# Altium PCB Baseboard-Development.PcbDoc (part 4 of 8)
Units mm, origin at the board's own origin, x right, y up, seen from the top; angles counter-clockwise.
Board outline 120 x 90 mm, 6 copper layers (Top Layer, SIGNAL-1, PWR, SIGNAL-2, GND-2, Bottom Layer), stack 1.705 mm thick; 417 components, 313 nets, 1500 pads, 606 vias.
Unrouted connection lines stored in the file: 357.
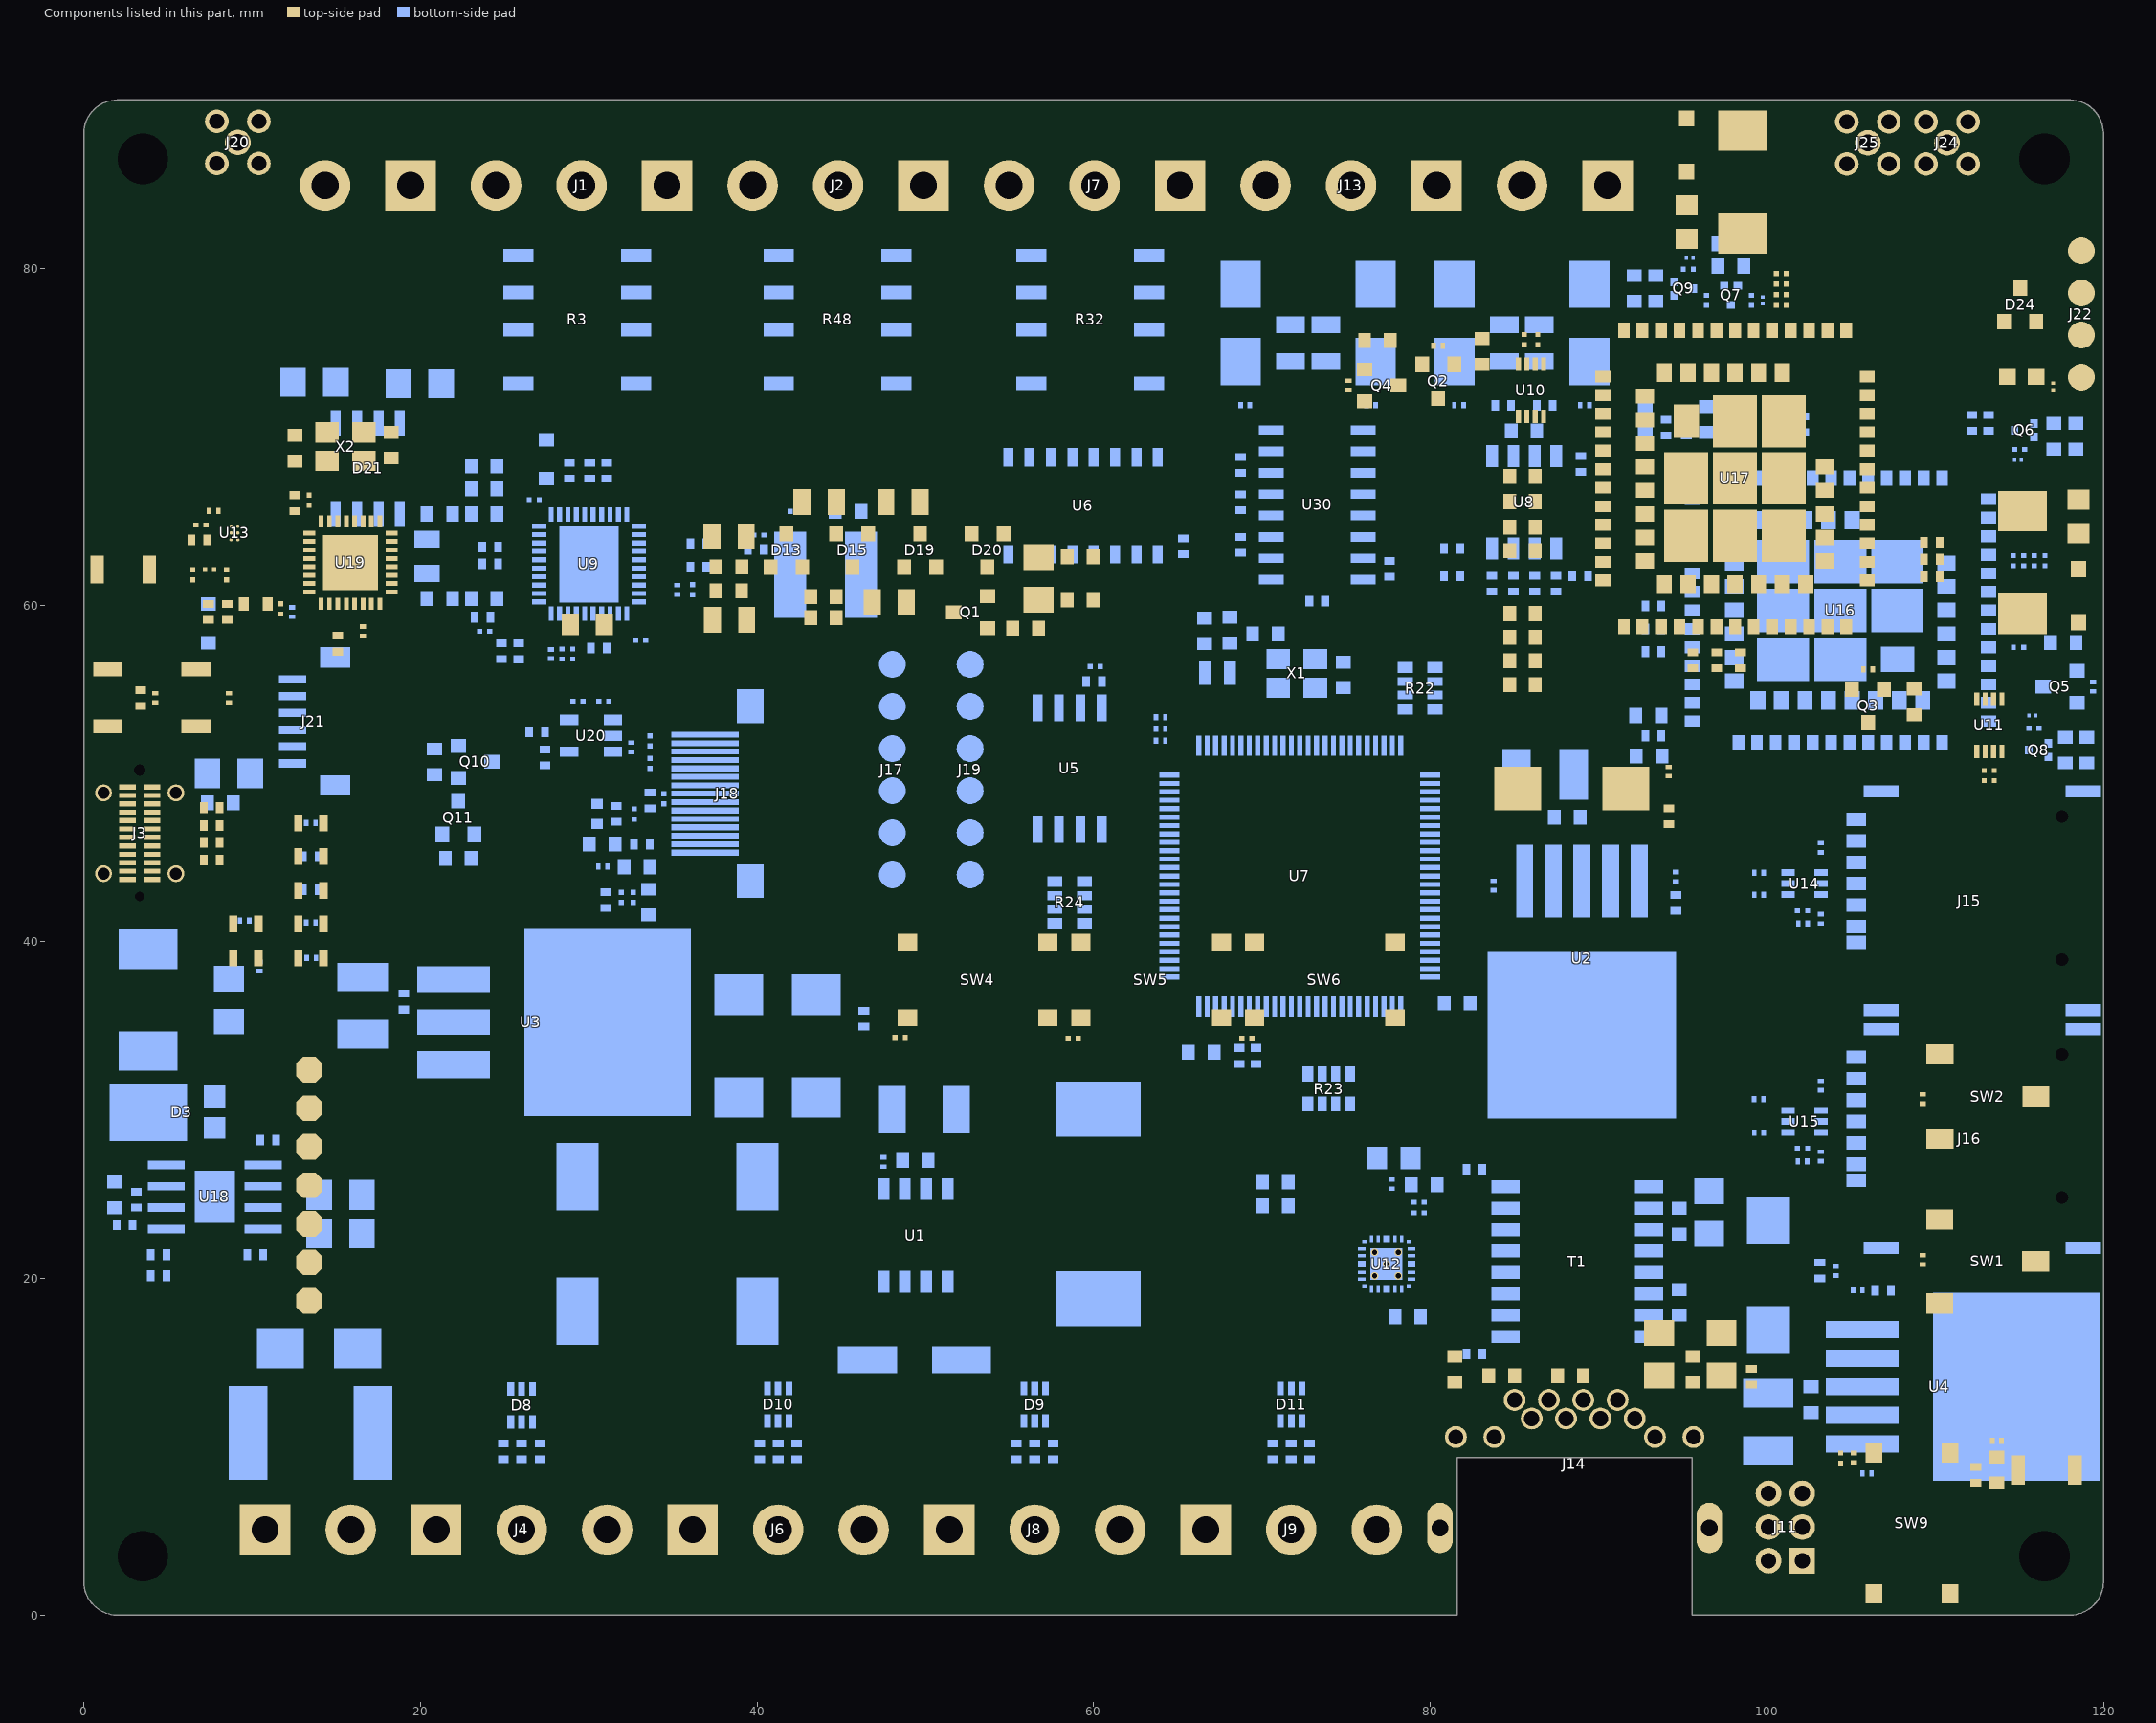
[diagram p6: the components of this part, seen from the top]

## Part data (continued)
R14 R27: library part RC0402FR-0747KL, "RES 47K OHM 1% 1/16W 0402", Case Code (Imperial)=0402, Case Code (Metric)=1005, LCSC Part Number=C93943, Manufacturer=Yageo, Max Operating Temperature=155°C, Max Power Dissipation=63mW, Min Operating Temperature=-55°C, Package Quantity=1, Power Rating=62.5mW, Resistance=47kR, Resistance Tolerance=1%, Resistor Type="Thick Film", Temperature Coefficient=100ppm/°C, Voltage Rating=50V, Case/Package=0402, Category="Chip SMD Resistors", ComponentLink1Description=https://datasheet.ciiva.com/46412/1018594-46412839.pdf?src-supplier=Element14, ComponentLink1URL=https://datasheet.ciiva.com/46412/1018594-46412839.pdf?src-supplier=Element14, ComponentLink2Description=https://datasheet.ciiva.com/2453/pyu-r-int-thick-7-2453389.pdf?src-supplier=Digi-Key, ComponentLink2URL=https://datasheet.ciiva.com/2453/pyu-r-int-thick-7-2453389.pdf?src-supplier=Digi-Key, ComponentLink3Description=https://datasheet.ciiva.com/2453/pyu-r-int-thick-7-2453390.pdf?src-supplier=Digi-Key, ComponentLink3URL=https://datasheet.ciiva.com/2453/pyu-r-int-thick-7-2453390.pdf?src-supplier=Digi-Key, ComponentLink4Description=https://datasheet.ciiva.com/2453/pyu-r-int-thick-7-2453388.pdf?src-supplier=Digi-Key, ComponentLink4URL=https://datasheet.ciiva.com/2453/pyu-r-int-thick-7-2453388.pdf?src-supplier=Digi-Key, ComponentLink5Description=https://datasheet.ciiva.com/15189/getdatasheetpartid-323748-15189466.pdf?src-supplier=Verical, ComponentLink5URL=https://datasheet.ciiva.com/15189/getdatasheetpartid-323748-15189466.pdf?src-supplier=Verical, ComponentLink6Description=https://datasheet.ciiva.com/16793/pyu-rc0402-51-rohs-l-6-r-16793430.pdf?src-supplier=Future+Electronics, ComponentLink6URL=https://datasheet.ciiva.com/16793/pyu-rc0402-51-rohs-l-6-r-16793430.pdf?src-supplier=Future+Electronics, Construction=Rectangular, Depth=0.5mm, Features="Moisture Resistant", Height=0.016inch, Item Type=Resistor, Lead Free="Lead Free", Length=1mm, Manufacturer Part Number=RC0402FR-0747KL, Military Standard=Not, Number of Terminations=2, Packaging="Tape and Reel", Pricing 1="10000=0.00085, 20000=0.00087, 40000=0.00084, 60000=0.00083, 80000=0.00079, 100000=0.00078, 1000000=0.00076 (USD)", RoHS=Yes, RoHS Compliant=Yes, Series=RC, Size Code=0402, Stock 1=680000, Supplier 1=Avnet, Supplier Part Number 1=RC0402FR-0747KL, Termination=SMD/SMT, Tolerance=1%, Width=0.02inch
R15: library part FRC0402F1693TS, "169kΩ 62.5mW Thick Film Resistors 50V ±100ppm/℃ ±1% 0402 Chip Resistor - Surface Mount ROHS", LCSC Part Number=C2974012, Manufacturer=FOJAN, Package=0402, ComponentLink1Description=LCSC, ComponentLink1URL=https://www.lcsc.com/product-detail/Chip-Resistor-Surface-Mount_FOJAN-FRC0402F1693TS_C2974012.html, Item Type=Resistor, Manufacturer Part Number=FRC0402F1693TS
R20 R25 R50 R134 R135 R136 R137 R138 R142 R143: library part RC0402FR-070RL, "RES 0 OHM JUMPER 1/16W 0402", Case Code (Imperial)=0402, Case Code (Metric)=1005, LCSC Part Number=C106231, Manufacturer=Yageo, Max Operating Temperature=155°C, Max Power Dissipation=63mW, Min Operating Temperature=-55°C, Power Rating=62.5mW, Resistance=0R, Resistor Type="Thick Film", Supplier Part Number 1=603-RC0402FR-070RL, Temperature Coefficient=200ppm/°C, Tolerance=1%, Voltage Rating=50V, Case/Package=0402, Category="Chip SMD Resistors", ComponentLink1Description=https://datasheet.ciiva.com/8896/pyu-rc0402-51-rohs-l-6-8896149.pdf?src-supplier=Avnet, ComponentLink1URL=https://datasheet.ciiva.com/8896/pyu-rc0402-51-rohs-l-6-8896149.pdf?src-supplier=Avnet, ComponentLink2Description=https://datasheet.ciiva.com/16790/pyu-rc0402-51-rohs-l-6-r-16790444.pdf?src-supplier=Future+Electronics, ComponentLink2URL=https://datasheet.ciiva.com/16790/pyu-rc0402-51-rohs-l-6-r-16790444.pdf?src-supplier=Future+Electronics, Contact Plating=Tin,Matte, Features="Moisture Resistant", Height=0.35mm, Lead Free="Lead Free", Length=1mm, Manufacturer Part Number=RC0402FR-070RL, Mount="Surface Mount", Number of Terminations=2, Packaging="Tape and Reel", Pricing 1="1=0.10000, 10=0.01400, 50=0.01400, 100=0.00600, 1000=0.00300, 5000=0.00200, 10000=0.00100 (USD)", Radiation Hardening=No, RoHS=Yes, RoHS Compliant=Yes, Series=RC, Size Code=0402, Stock 1=8556842, Supplier 1=Mouser, Termination=SMD/SMT, Width=0.5mm
R22 R23 R24: library part YC164-JR-07100KL, "RES ARRAY 4 RES 100K OHM 1206", LCSC Part Number=C192933, Manufacturer=Yageo, Supplier Part Number=4734737, Category="Resistor Arrays", ComponentLink1Description=https://datasheet.ciiva.com/11807/0900766b80c69e1d-11807026.pdf?src-supplier=Rs, ComponentLink1URL=https://datasheet.ciiva.com/11807/0900766b80c69e1d-11807026.pdf?src-supplier=Rs, ComponentLink2Description=https://datasheet.ciiva.com/8017/443424-8017993.pdf?src-supplier=Element14, ComponentLink2URL=https://datasheet.ciiva.com/8017/443424-8017993.pdf?src-supplier=Element14, ComponentLink3Description=https://datasheet.ciiva.com/8017/443424-8017994.pdf?src-supplier=Element14, ComponentLink3URL=https://datasheet.ciiva.com/8017/443424-8017994.pdf?src-supplier=Element14, ComponentLink4Description=https://datasheet.ciiva.com/17478/pyu-yc-tc164-51-rohs-l-3-17478885.pdf?src-supplier=Future+Electronics, ComponentLink4URL=https://datasheet.ciiva.com/17478/pyu-yc-tc164-51-rohs-l-3-17478885.pdf?src-supplier=Future+Electronics, ComponentLink5Description=https://datasheet.ciiva.com/2693/pyu-yc-tc164-51-rohs-l-3-2693249.pdf?src-supplier=Digi-Key, ComponentLink5URL=https://datasheet.ciiva.com/2693/pyu-yc-tc164-51-rohs-l-3-2693249.pdf?src-supplier=Digi-Key, ComponentLink6Description=https://datasheet.ciiva.com/2693/pyu-yc-tc164-51-rohs-l-3-2693250.pdf?src-supplier=Digi-Key, ComponentLink6URL=https://datasheet.ciiva.com/2693/pyu-yc-tc164-51-rohs-l-3-2693250.pdf?src-supplier=Digi-Key, ComponentLink7Description=https://datasheet.ciiva.com/2693/pyu-yc-tc164-51-rohs-l-3-2693251.pdf?src-supplier=Digi-Key, ComponentLink7URL=https://datasheet.ciiva.com/2693/pyu-yc-tc164-51-rohs-l-3-2693251.pdf?src-supplier=Digi-Key, Item Type=Resistor, Manufacturer Part Number=YC164-JR-07100KL, Pricing="5000=0.0086, 20000=0.0082, 50000=0.0078, 100000=0.0078, 125000=0.0075, 200000=0.0076, 625000=0.0071 (USD)", RoHS=Yes, Stock=10000, Supplier="Future Electronics"
R28 R29 R66 R67: library part RC0603FR-0715RL, "RES 15 OHM 1% 1/10W 0603", Current Rating=50mA, LCSC Part Number=C128059, Manufacturer=Yageo, Supplier Part Number=6308514, Voltage Rating (AC)=50V, Category="Chip SMD Resistors", ComponentLink1Description=https://datasheet.ciiva.com/5989/1686128-5989704.pdf?src-supplier=Farnell, ComponentLink1URL=https://datasheet.ciiva.com/5989/1686128-5989704.pdf?src-supplier=Farnell, ComponentLink2Description=https://datasheet.ciiva.com/8890/pyu-rc0603-51-rohs-l-4-8890742.pdf?src-supplier=Avnet, ComponentLink2URL=https://datasheet.ciiva.com/8890/pyu-rc0603-51-rohs-l-4-8890742.pdf?src-supplier=Avnet, ComponentLink3Description=https://datasheet.ciiva.com/12557/rc0603-272842-12557839.pdf?src-supplier=Mouser, ComponentLink3URL=https://datasheet.ciiva.com/12557/rc0603-272842-12557839.pdf?src-supplier=Mouser, ComponentLink4Description=https://datasheet.ciiva.com/2454/pyu-r-int-thick-7-2454840.pdf?src-supplier=Digikey, ComponentLink4URL=https://datasheet.ciiva.com/2454/pyu-r-int-thick-7-2454840.pdf?src-supplier=Digikey, ComponentLink5Description=https://datasheet.ciiva.com/2454/pyu-r-int-thick-7-2454841.pdf?src-supplier=Digikey, ComponentLink5URL=https://datasheet.ciiva.com/2454/pyu-r-int-thick-7-2454841.pdf?src-supplier=Digikey, ComponentLink6Description=https://datasheet.ciiva.com/2454/pyu-r-int-thick-7-2454842.pdf?src-supplier=Digikey, ComponentLink6URL=https://datasheet.ciiva.com/2454/pyu-r-int-thick-7-2454842.pdf?src-supplier=Digikey, ComponentLink7Description=https://datasheet.ciiva.com/7746/443971-7746262.pdf?src-supplier=Element14, ComponentLink7URL=https://datasheet.ciiva.com/7746/443971-7746262.pdf?src-supplier=Element14, ComponentLink8Description=https://datasheet.ciiva.com/7746/443971-7746263.pdf?src-supplier=Element14, ComponentLink8URL=https://datasheet.ciiva.com/7746/443971-7746263.pdf?src-supplier=Element14, Contact Material=157ConductorMaterial, Item Type=Resistor, Lead Free=5697LeadFree, Manufacturer Part Number=RC0603FR-0715RL, Pricing="5000=0.0011, 75000=0.001, 200000=0.001, 500000=0.001, 1250000=0.0009 (USD)", RoHS=Yes, Stock=5830000, Supplier="Future Electronics", Weight=250mg
R30: library part SCR0805F1M65, "125mW Thick Film Resistors 150V ±1% 1.65MΩ 0805 Chip Resistor - Surface Mount ROHS", LCSC Part Number=C3016615, Manufacturer=VO, Package=0805, ComponentLink1Description=LCSC, ComponentLink1URL=https://www.lcsc.com/product-detail/Chip-Resistor-Surface-Mount_VO-SCR0805F1M65_C3016615.html, Item Type=Resistor, Manufacturer Part Number=SCR0805F1M65
R31 R33: library part 0603WAD1103T5E, "110kΩ 0603 Chip Resistor - Surface Mount ROHS", LCSC Part Number=C423090, Manufacturer=UNI-ROYAL, ComponentLink1Description=LCSC, ComponentLink1URL=https://www.lcsc.com/product-detail/Chip-Resistor-Surface-Mount_UNI-ROYAL-Uniroyal-Elec-0603WAD1103T5E_C423090.html, Item Type=Resistor, Manufacturer Part Number=0603WAD1103T5E
R35 R36 R37 R38 R39 R40 R41 R42 R43 R44 R45 R46 R68 R69 R70 R71 R72 R77: library part RC0402FR-074K7L, "RES 4.7K OHM 1% 1/16W 0402", Case Code (Imperial)=0402, Case Code (Metric)=1005, LCSC Part Number=C105871, Manufacturer=Yageo, Max Operating Temperature=155°C, Max Power Dissipation=63mW, Min Operating Temperature=-55°C, Power Rating=62.5mW, Resistance=4.7kR, Resistance Tolerance=1%, Resistor Type="Thick Film", Temperature Coefficient=100ppm/°C, Voltage Rating=50V, Case/Package=0402, Category="Chip SMD Resistors", ComponentLink1Description=https://datasheet.ciiva.com/22661/1686128-22661342.pdf?src-supplier=Element14, ComponentLink1URL=https://datasheet.ciiva.com/22661/1686128-22661342.pdf?src-supplier=Element14, ComponentLink2Description=https://datasheet.ciiva.com/7850/1018594-7850022.pdf?src-supplier=Element14, ComponentLink2URL=https://datasheet.ciiva.com/7850/1018594-7850022.pdf?src-supplier=Element14, ComponentLink3Description=https://datasheet.ciiva.com/7850/1018594-7850023.pdf?src-supplier=Element14, ComponentLink3URL=https://datasheet.ciiva.com/7850/1018594-7850023.pdf?src-supplier=Element14, ComponentLink4Description=https://datasheet.ciiva.com/15215/getdatasheetpartid-328119-15215035.pdf?src-supplier=Verical, ComponentLink4URL=https://datasheet.ciiva.com/15215/getdatasheetpartid-328119-15215035.pdf?src-supplier=Verical, Construction=Rectangular, Depth=0.5mm, Features="Moisture Resistant", Height=0.32mm, Height - Seated (Max)=0.016inch, Item Type=Resistor, Lead Free="Lead Free", Length=1mm, Manufacturer Part Number=RC0402FR-074K7L, Military Standard=Not, Number of Pins=2, Number of Terminations=2, Packaging="Tape and Reel", Pricing 1="10000=0.00085 (USD)", Reach SVHC Compliant=Yes, RoHS=Yes, RoHS Compliant=Yes, Series=RC, Size Code=0402, Stock 1=2420000, Supplier 1=Avnet, Supplier Part Number 1=RC0402FR-074K7L, Termination=SMD/SMT, Tolerance=1%, Voltage Rating (DC)=50V, Width=0.5mm
R47 R53: library part RT0603BRD07681KL, "RES SMD 681K OHM 0.1% 1/10W 0603", Case Code (Imperial)=0603, Case Code (Metric)=1608, LCSC Part Number=C861520, Manufacturer=Yageo, Max Operating Temperature=155°C, Max Power Dissipation=100mW, Min Operating Temperature=-55°C, Resistor Type="Thin Film", Supplier Part Number 1=603-RT0603BRD07681KL, Temperature Coefficient=25ppm/°C, Tolerance=0.1%, Voltage Rating=75V, Case/Package=0603, Category="Chip SMD Resistors", ComponentLink1Description=https://datasheet.ciiva.com/12800/pyu-rt-1-to-0-05-rohs-l-4-12800173.pdf?src-supplier=Mouser, ComponentLink1URL=https://datasheet.ciiva.com/12800/pyu-rt-1-to-0-05-rohs-l-4-12800173.pdf?src-supplier=Mouser, Features="Moisture Resistant", Height=0.022inch, Item Type=Resistor, Length=0.063inch, Manufacturer Part Number=RT0603BRD07681KL, Number of Terminations=2, Packaging="Tape and Reel", Power Rating=100mW, Pricing 1="1=0.30000, 10=0.25300, 50=0.25300, 100=0.09900, 1000=0.04200, 10000=0.03400 (USD)", RoHS=Yes, RoHS Compliant=Yes, Series=RT, Stock 1=6293, Supplier 1=Mouser, Termination=SMD/SMT, Weight=7.1E-05oz, Width=0.031inch
R49: library part RT0603BRB072K2L, "RES SMD 2.2K OHM 0.1% 1/10W 0603", Case Code (Imperial)=0603, Case Code (Metric)=1608, LCSC Part Number=C860297, Manufacturer=Yageo, Max Operating Temperature=155°C, Max Power Dissipation=100mW, Min Operating Temperature=-55°C, Supplier Part Number=YAG2182CT-ND, Temperature Coefficient=10ppm/°C, Tolerance=0.1%, Case/Package=0603, Category="Chip SMD Resistors", ComponentLink1Description=http://www.yageo.com/documents/recent/PYu-RT_1-to-0.01_RoHS_L_7.pdf?src-supplier=Digi-Key, ComponentLink1URL=http://www.yageo.com/documents/recent/PYu-RT_1-to-0.01_RoHS_L_7.pdf?src-supplier=Digi-Key, ComponentLink2Description=http://www.yageo.com/documents/recent/PYu-RT_1-to-0.01_RoHS_L_9.pdf?src-supplier=Digi-Key, ComponentLink2URL=http://www.yageo.com/documents/recent/PYu-RT_1-to-0.01_RoHS_L_9.pdf?src-supplier=Digi-Key, Item Type=Resistor, Manufacturer Part Number=RT0603BRB072K2L, Number of Terminations=2, Packaging="Cut Tape", Pricing="1=0.6, 10=0.446, 50=0.3148, 100=0.2597, 500=0.1836, 1000=0.14563 (USD)", RoHS=Yes, RoHS Compliant=Yes, Series=RT, Stock=518, Supplier=Digi-Key
R54: library part RC0402FR-0749K9L, "RES 49.9K OHM 1% 1/16W 0402", Case Code (Imperial)=0402, Case Code (Metric)=1005, LCSC Part Number=C137969, Manufacturer=Yageo, Max Operating Temperature=155°C, Max Power Dissipation=63mW, Min Operating Temperature=-55°C, Power Rating=62.5mW, Supplier Part Number=311-49.9KLRCT-ND, Temperature Coefficient=100ppm/°C, Tolerance=1%, Voltage Rating=50V, Case/Package=0402, Category="Chip SMD Resistors", ComponentLink1Description=https://datasheet.ciiva.com/17071/pyu-rc0402-51-rohs-l-6-r-17071066.pdf?src-supplier=Future+Electronics, ComponentLink1URL=https://datasheet.ciiva.com/17071/pyu-rc0402-51-rohs-l-6-r-17071066.pdf?src-supplier=Future+Electronics, Construction=Rectangular, Depth=0.5mm, Features="Moisture Resistant", Item Type=Resistor, Lead Free="Lead Free", Length=1mm, Manufacturer Part Number=RC0402FR-0749K9L, Military Standard=Not, Number of Terminations=2, Packaging="Tape and Reel", Pricing="1=0.1, 10=0.015, 50=0.0088, 100=0.0073, 500=0.00488, 1000=0.00417, 5000=0.00297 (USD)", RoHS=Yes, RoHS Compliant=Yes, Series=RC, Stock=5084418, Supplier=Digikey, Termination=SMD/SMT, Voltage Rating (DC)=50V
R55: library part RT0603BRC076K49L, "RES SMD 6.49KOHM 0.1% 1/10W 0603", Case/Package=0603, LCSC Part Number=C860999, Manufacturer=Yageo, Max Operating Temperature=155°C, Max Power Dissipation=100mW, Min Operating Temperature=-55°C, Supplier Part Number=YAG4462CT-ND, Temperature Coefficient=15ppm/°C, Tolerance=0.1%, Category="Chip SMD Resistors", Features="Moisture Resistant", Height=0.022inch, Item Type=Resistor, Length=0.063inch, Manufacturer Part Number=RT0603BRC076K49L, Number of Terminations=2, Packaging="Tape and Reel", Pricing="1=0.39, 10=0.284, 50=0.2192, 100=0.1947, 500=0.14568, 1000=0.12789 (USD)", RoHS=Yes, RoHS Compliant=Yes, Series=RT, Stock=3523, Supplier=Digikey, Width=0.031inch
R56: library part 0603WAF6802T5E, "100mW Thick Film Resistors 75V ±100ppm/℃ ±1% 68kΩ 0603 Chip Resistor - Surface Mount ROHS", LCSC Part Number=C23231, Manufacturer="UNI-ROYAL(Uniroyal Elec)", Package=0603, ComponentLink1Description=LCSC, ComponentLink1URL=https://www.lcsc.com/product-detail/Chip-Resistor-Surface-Mount_UNI-ROYAL-Uniroyal-Elec-0603WAF6802T5E_C23231.html, Item Type=Resistor, Manufacturer Part Number=0603WAF6802T5E
R57 R61 R83: library part RC0603JR-070RL, "RES 0 OHM JUMPER 1/10W 0603", Case Code (Imperial)=0603, Case Code (Metric)=1608, LCSC Part Number=C95177, Manufacturer=Yageo, Max Operating Temperature=155°C, Max Power Dissipation=100mW, Min Operating Temperature=-55°C, Package Quantity=5000, Resistance=0mR, Resistance Tolerance=5%, Resistor Type="Thick Film", Supplier Part Number 1=311-0.0GRCT-ND, Temperature Coefficient=200ppm/°C, Tolerance=1%, Voltage Rating=50V, Case/Package=0603, Category="Chip SMD Resistors", Construction=Rectangular, Contact Plating=Tin,Matte, Depth=0.8mm, Features="Moisture Resistant", Height=0.45mm, Item Type=Resistor, Lead Free="Lead Free", Length=1.6mm, Manufacturer Part Number=RC0603JR-070RL, Military Standard=Not, Number of Pins=2, Number of Terminations=2, Packaging="Tape and Reel", Power Rating=100mW, Pricing 1="1=0.10000, 10=0.01700, 25=0.01240, 50=0.00960, 100=0.00700, 250=0.00536, 500=0.00430, 1000=0.00316 (USD)", Radiation Hardening=No, Reach SVHC Compliant="No SVHC", RoHS=Yes, RoHS Compliant=Yes, Series=RC, Size Code=0603, Stock 1=18081776, Supplier 1=Digi-Key, Technology="THICK FILM", Termination=SMD/SMT, Voltage Rating (DC)=50V, Width=0.8mm
R58 R65: library part RC0201FR-0747KL, "RES 47K OHM 1% 1/20W 0201", Case Code (Imperial)=0201, Case Code (Metric)=0603, LCSC Part Number=C138139, Manufacturer=Yageo, Max Operating Temperature=125°C, Max Power Dissipation=50mW, Min Operating Temperature=-55°C, Package Quantity=10000, Resistance Tolerance=1%, Resistor Type="Thick Film", Supplier Part Number=7316417, Temperature Coefficient=200ppm/°C, Voltage Rating=25V, Case/Package=0201, Category="Chip SMD Resistors", ComponentLink1Description=https://datasheet.ciiva.com/7672/1563626-7672232.pdf?src-supplier=Element14, ComponentLink1URL=https://datasheet.ciiva.com/7672/1563626-7672232.pdf?src-supplier=Element14, ComponentLink2Description=https://datasheet.ciiva.com/29710/pyu-r-int-thick-7-29710919.pdf?src-supplier=Digi-Key, ComponentLink2URL=https://datasheet.ciiva.com/29710/pyu-r-int-thick-7-29710919.pdf?src-supplier=Digi-Key, ComponentLink3Description=https://datasheet.ciiva.com/29710/pyu-r-int-thick-7-29710920.pdf?src-supplier=Digi-Key, ComponentLink3URL=https://datasheet.ciiva.com/29710/pyu-r-int-thick-7-29710920.pdf?src-supplier=Digi-Key, ComponentLink4Description=https://datasheet.ciiva.com/25647/pyu-r-int-thick-7-25647310.pdf?src-supplier=Digi-Key, ComponentLink4URL=https://datasheet.ciiva.com/25647/pyu-r-int-thick-7-25647310.pdf?src-supplier=Digi-Key, ComponentLink5Description=https://datasheet.ciiva.com/26829/getdatasheetpartid-422496-26829867.pdf?src-supplier=Verical, ComponentLink5URL=https://datasheet.ciiva.com/26829/getdatasheetpartid-422496-26829867.pdf?src-supplier=Verical, ComponentLink6Description=https://datasheet.ciiva.com/8889/pyu-rc0201-51-rohs-l-8-8889065.pdf?src-supplier=Avnet, ComponentLink6URL=https://datasheet.ciiva.com/8889/pyu-rc0201-51-rohs-l-8-8889065.pdf?src-supplier=Avnet, Construction=Rectangular, Contact Plating=Tin,Matte, Depth=0.3mm, Features="Moisture Resistant", Height=0.01inch, Item Type=Resistor, Lead Free=5697LeadFree, Length=0.6mm, Manufacturer Part Number=RC0201FR-0747KL, Military Standard=Not, Number of Terminations=2, Packaging="Tape and Reel", Power Rating=50mW, Pricing="10000=0.0014, 50000=0.0013, 250000=0.0013, 750000=0.0012, 2000000=0.0011 (USD)", Reach SVHC Compliant=Unknown, RoHS=Yes, RoHS Compliant=Yes, Series=RC, Stock=1020000, Supplier="Future Electronics", Termination=SMD/SMT, Tolerance=1%, Weight=6E-06oz, Width=0.3mm
R60: library part PT1206FR-7W0R2L, "RES 0.2 OHM 1% 1/2W 1206", Case/Package=1206, LCSC Part Number=C309533, Manufacturer=Yageo, Max Operating Temperature=155°C, Max Power Dissipation=500mW, Min Operating Temperature=-55°C, Supplier Part Number=1996026P, Temperature Coefficient=75ppm/°C, Tolerance=1%, Category="Chip SMD Resistors", ComponentLink1Description=http://www.mouser.com/ds/2/447/yageodocoutput-1101729.pdf?src-supplier=Mouser, ComponentLink1URL=http://www.mouser.com/ds/2/447/yageodocoutput-1101729.pdf?src-supplier=Mouser, ComponentLink2Description=http://www.yageo.com/exep/pages/download/literatures/R-chip_current%20sensor_20140512.pdf?src-supplier=Digikey, ComponentLink2URL=http://www.yageo.com/exep/pages/download/literatures/R-chip_current%20sensor_20140512.pdf?src-supplier=Digikey, Features="Moisture Resistant,Automotive AEC-Q200", Height=0.026inch, Item Type=Resistor, Length=0.122inch, Manufacturer Part Number=PT1206FR-7W0R2L, Number of Terminations=2, Packaging="Tape and Reel", Pricing="100=0.134, 250=0.125, 500=0.117, 1000=0.106 (GBP)", RoHS=Yes, Series=PT, Stock=1100, Supplier=Rs, Width=0.063inch
R62 R82: library part FRC1206F1474TS, "250mW Thick Film Resistors 200V ±100ppm/℃ ±1% 1.47MΩ 1206 Chip Resistor - Surface Mount ROHS", LCSC Part Number=C5126193, Manufacturer=FOJAN, Package=1206, ComponentLink1Description=LCSC, ComponentLink1URL=https://www.lcsc.com/product-detail/Chip-Resistor-Surface-Mount_FOJAN-FRC1206F1474TS_C5126193.html, Item Type=Resistor, Manufacturer Part Number=FRC1206F1474TS
R63 R64 R79 R80 R81 R119: library part RC0402FR-070RL, "RES 0 OHM JUMPER 1/16W 0402", Case Code (Imperial)=0402, Case Code (Metric)=1005, LCSC Part Number=C106231, Manufacturer=Yageo, Max Operating Temperature=155°C, Max Power Dissipation=63mW, Min Operating Temperature=-55°C, Power Rating=62.5mW, Resistor Type="Thick Film", Supplier Part Number 1=603-RC0402FR-070RL, Temperature Coefficient=200ppm/°C, Tolerance=1%, Voltage Rating=50V, Case/Package=0402, Category="Chip SMD Resistors", ComponentLink1Description=https://datasheet.ciiva.com/8896/pyu-rc0402-51-rohs-l-6-8896149.pdf?src-supplier=Avnet, ComponentLink1URL=https://datasheet.ciiva.com/8896/pyu-rc0402-51-rohs-l-6-8896149.pdf?src-supplier=Avnet, ComponentLink2Description=https://datasheet.ciiva.com/16790/pyu-rc0402-51-rohs-l-6-r-16790444.pdf?src-supplier=Future+Electronics, ComponentLink2URL=https://datasheet.ciiva.com/16790/pyu-rc0402-51-rohs-l-6-r-16790444.pdf?src-supplier=Future+Electronics, Contact Plating=Tin,Matte, Features="Moisture Resistant", Height=0.35mm, Lead Free="Lead Free", Length=1mm, Manufacturer Part Number=RC0402FR-070RL, Mount="Surface Mount", Number of Terminations=2, Packaging="Tape and Reel", Pricing 1="1=0.10000, 10=0.01400, 50=0.01400, 100=0.00600, 1000=0.00300, 5000=0.00200, 10000=0.00100 (USD)", Radiation Hardening=No, Resistance=0R, RoHS=Yes, RoHS Compliant=Yes, Series=RC, Size Code=0402, Stock 1=8556842, Supplier 1=Mouser, Termination=SMD/SMT, Width=0.5mm
R73 R74 R75 R76 R106 R111 R112 R126 R127 R128 R129 R130: library part RC0201FR-0722RL, "RES 22 OHM 1% 1/20W 0201", LCSC Part Number=C155743, Manufacturer=Yageo, Supplier Part Number=5973409, Category="Chip SMD Resistors", ComponentLink1Description=https://datasheet.ciiva.com/7672/1563626-7672215.pdf?src-supplier=Element14, ComponentLink1URL=https://datasheet.ciiva.com/7672/1563626-7672215.pdf?src-supplier=Element14, Item Type=Resistor, Manufacturer Part Number=RC0201FR-0722RL, Pricing="10000=0.0014, 50000=0.0013, 250000=0.0013, 750000=0.0012, 2000000=0.0011 (USD)", RoHS=Yes, Stock=17980000, Supplier="Future Electronics"
R78: library part RC0603JR-07120RL, "RES 120 OHM 5% 1/10W 0603", LCSC Part Number=C114681, Manufacturer=Yageo, Supplier Part Number=4045720, Voltage Rating (AC)=50V, Category="Chip SMD Resistors", ComponentLink1Description=https://datasheet.ciiva.com/15189/getdatasheetpartid-326532-15189850.pdf?src-supplier=Verical, ComponentLink1URL=https://datasheet.ciiva.com/15189/getdatasheetpartid-326532-15189850.pdf?src-supplier=Verical, ComponentLink2Description=https://datasheet.ciiva.com/2518/pyu-r-int-thick-7-2518850.pdf?src-supplier=Digi-Key, ComponentLink2URL=https://datasheet.ciiva.com/2518/pyu-r-int-thick-7-2518850.pdf?src-supplier=Digi-Key, ComponentLink3Description=https://datasheet.ciiva.com/2518/pyu-r-int-thick-7-2518851.pdf?src-supplier=Digi-Key, ComponentLink3URL=https://datasheet.ciiva.com/2518/pyu-r-int-thick-7-2518851.pdf?src-supplier=Digi-Key, ComponentLink4Description=https://datasheet.ciiva.com/2518/pyu-r-int-thick-7-2518852.pdf?src-supplier=Digi-Key, ComponentLink4URL=https://datasheet.ciiva.com/2518/pyu-r-int-thick-7-2518852.pdf?src-supplier=Digi-Key, ComponentLink5Description=https://datasheet.ciiva.com/46395/443971-46395070.pdf?src-supplier=Element14, ComponentLink5URL=https://datasheet.ciiva.com/46395/443971-46395070.pdf?src-supplier=Element14, ComponentLink6Description=https://datasheet.ciiva.com/12555/rc0603-272842-12555246.pdf?src-supplier=Mouser, ComponentLink6URL=https://datasheet.ciiva.com/12555/rc0603-272842-12555246.pdf?src-supplier=Mouser, Item Type=Resistor, Manufacturer Part Number=RC0603JR-07120RL, Pricing="5000=0.0015, 75000=0.0015, 250000=0.0014, 750000=0.0013, 2500000=0.0012 (USD)", RoHS=Yes, Stock=570000, Supplier="Future Electronics"
R84 R85: library part RC0603JR-07330RL, "RES  SMD 330R 100 mW 0603", Case Code (Imperial)=0603, Case Code (Metric)=1608, LCSC Part Number=C105879, Manufacturer=Yageo, Max Operating Temperature=155°C, Max Power Dissipation=100mW, Min Operating Temperature=-55°C, Package Quantity=5000, Resistance Tolerance=5%, Resistor Type="Thick Film", Supplier Part Number 1=311-330GRCT-ND, Temperature Coefficient=100ppm/°C, Voltage Rating=50V, Case/Package=0603, Category="Chip SMD Resistors", Construction=Rectangular, Depth=0.8mm, Features="Moisture Resistant", Height=0.45mm, Item Type=Resistor, Lead Free="Lead Free", Length=1.6mm, Manufacturer Part Number=RC0603JR-07330RL, Military Standard=Not, Number of Pins=2, Number of Terminations=2, Packaging="Tape and Reel", Power Rating=100mW, Pricing 1="1=0.10000, 10=0.02000, 100=0.00800, 1000=0.00360, 2500=0.00312 (USD)", REACH SVHC="No SVHC", Resistance=330R, RoHS=Yes, RoHS Compliant=Yes, Series=RC, Size Code=0603, Stock 1=1074593, Supplier 1=Digi-Key, Termination=SMD/SMT, Tolerance=5%, Voltage Rating (DC)=50V, Width=0.8mm
R86 R87 R88 R89: library part RC0603FR-0775RL, "RES 75 OHM 1% 1/10W 0603", Case Code (Imperial)=0603, Case Code (Metric)=1608, LCSC Part Number=C112309, Manufacturer=Yageo, Max Operating Temperature=155°C, Max Power Dissipation=100mW, Min Operating Temperature=-55°C, Package Quantity=1, Resistance Tolerance=1%, Resistor Type="Thick Film", Supplier Part Number=311-75.0HRCT-ND, Temperature Coefficient=100ppm/°C, Voltage Rating=50V, Case/Package=0603, Category="Chip SMD Resistors", Construction=Rectangular, Depth=0.8mm, Features="Moisture Resistant", Height=0.022inch, Item Type=Resistor, Lead Free=5697LeadFree, Length=0.063inch, Manufacturer Part Number=RC0603FR-0775RL, Military Standard=Not, Number of Terminations=2, Packaging="Tape and Reel", Power Rating=100mW, Pricing="1=0.1, 10=0.019, 50=0.0112, 100=0.0093, 500=0.00622, 1000=0.00532 (USD)", Reach SVHC Compliant=No, RoHS=Yes, RoHS Compliant=Yes, Series=RC, Stock=844005, Supplier=Digikey, Technology="THICK FILM", Termination=SMD/SMT, Tolerance=1%, Voltage Rating (DC)=50V, Width=0.031inch
R90 R91 R99 R100: library part AC0201FR-07180RL, "RES SMD 180 OHM 1% 1/20W 0201", Case/Package=0201, LCSC Part Number=C226435, Manufacturer=Yageo, Max Operating Temperature=155°C, Max Power Dissipation=50mW, Min Operating Temperature=-55°C, Supplier Part Number=YAG5164CT-ND, Temperature Coefficient=200ppm/°C, Tolerance=1%, Category="Chip SMD Resistors", ComponentLink1Description=http://www.yageo.com/NewPortal/yageodocoutput?fileName=/pdf/R-Chip/PYu-AC_51_RoHS_L_5.pdf&src-supplier=Digi-Key, ComponentLink1URL=http://www.yageo.com/NewPortal/yageodocoutput?fileName=/pdf/R-Chip/PYu-AC_51_RoHS_L_5.pdf&src-supplier=Digi-Key, ComponentLink2Description=http://www.yageo.com/NewPortal/yageodocoutput?fileName=/pdf/R-Chip/PYu-AC_51_RoHS_L_6.pdf&src-supplier=Digi-Key, ComponentLink2URL=http://www.yageo.com/NewPortal/yageodocoutput?fileName=/pdf/R-Chip/PYu-AC_51_RoHS_L_6.pdf&src-supplier=Digi-Key, Features="Moisture Resistant,Automotive AEC-Q200", Height=0.01inch, Item Type=Resistor, Length=0.024inch, Manufacturer Part Number=AC0201FR-07180RL, Number of Terminations=2, Packaging="Tape and Reel", Pricing="1=0.1, 10=0.037, 50=0.024, 100=0.0203, 500=0.01412, 1000=0.0123, 5000=0.00915 (USD)", RoHS=Yes, RoHS Compliant=Yes, Series=AC, Stock=11641, Supplier=Digi-Key, Width=0.012inch
R92 R93 R101 R102: library part CRCW06031K00FKEA, "RES SMD 1K OHM 1% 1/10W 0603", Case Code (Imperial)=0603, Case Code (Metric)=1608, LCSC Part Number=C844920, Manufacturer="Vishay Dale", Max Operating Temperature=155°C, Max Power Dissipation=100mW, Min Operating Temperature=-55°C, Package Quantity=5000, Ratings=AEC-Q200, Resistance Tolerance=1%, Resistor Type="Thick Film", Supplier Part Number=71-CRCW0603-1.0K-E3, Temperature Coefficient=100ppm/°C, Voltage Rating=75V, Case/Package=0603, Category="Chip SMD Resistors", ComponentLink1Description=https://datasheet.ciiva.com/11808/0900766b80d98afc-11808625.pdf?src-supplier=Rs, ComponentLink1URL=https://datasheet.ciiva.com/11808/0900766b80d98afc-11808625.pdf?src-supplier=Rs, ComponentLink2Description=https://datasheet.ciiva.com/11808/0900766b80d98afc-11808625.pdf?src-supplier=Rs, ComponentLink2URL=https://datasheet.ciiva.com/11808/0900766b80d98afc-11808625.pdf?src-supplier=Rs, ComponentLink3Description=https://datasheet.ciiva.com/46441/1720486-46441623.pdf?src-supplier=Element14, ComponentLink3URL=https://datasheet.ciiva.com/46441/1720486-46441623.pdf?src-supplier=Element14, ComponentLink4Description=https://datasheet.ciiva.com/46441/1720486-46441622.pdf?src-supplier=Element14, ComponentLink4URL=https://datasheet.ciiva.com/46441/1720486-46441622.pdf?src-supplier=Element14, ComponentLink5Description=https://datasheet.ciiva.com/26316/fld-crcw-e3-data-en-26316551.pdf?src-supplier=Distrelec, ComponentLink5URL=https://datasheet.ciiva.com/26316/fld-crcw-e3-data-en-26316551.pdf?src-supplier=Distrelec, ComponentLink6Description=https://datasheet.ciiva.com/2465/dcrcwe3-2465536.pdf?src-supplier=Digi-Key, ComponentLink6URL=https://datasheet.ciiva.com/2465/dcrcwe3-2465536.pdf?src-supplier=Digi-Key, ComponentLink7Description=https://datasheet.ciiva.com/2465/dcrcwe3-2465534.pdf?src-supplier=Digi-Key, ComponentLink7URL=https://datasheet.ciiva.com/2465/dcrcwe3-2465534.pdf?src-supplier=Digi-Key, ComponentLink8Description=https://datasheet.ciiva.com/16199/dcrcwe3-16199053.pdf?src-supplier=Future+Electronics, ComponentLink8URL=https://datasheet.ciiva.com/16199/dcrcwe3-16199053.pdf?src-supplier=Future+Electronics, ComponentLink9Description=https://datasheet.ciiva.com/46385/1697337-46385497.pdf?src-supplier=Element14, ComponentLink9URL=https://datasheet.ciiva.com/46385/1697337-46385497.pdf?src-supplier=Element14, ComponentLink10Description=https://datasheet.ciiva.com/2465/dcrcwe3-2465535.pdf?src-supplier=Digi-Key, ComponentLink10URL=https://datasheet.ciiva.com/2465/dcrcwe3-2465535.pdf?src-supplier=Digi-Key, ComponentLink11Description=https://datasheet.ciiva.com/8336/dcrcwe3-8336822.pdf?src-supplier=Avnet, ComponentLink11URL=https://datasheet.ciiva.com/8336/dcrcwe3-8336822.pdf?src-supplier=Avnet, ComponentLink12Description=https://datasheet.ciiva.com/3257/dcrcwe3-3257132.pdf?src-supplier=Avnet, ComponentLink12URL=https://datasheet.ciiva.com/3257/dcrcwe3-3257132.pdf?src-supplier=Avnet, ComponentLink13Description=https://datasheet.ciiva.com/2465/dcrcwe3-2465535.pdf?src-supplier=Digikey, ComponentLink13URL=https://datasheet.ciiva.com/2465/dcrcwe3-2465535.pdf?src-supplier=Digikey, ComponentLink14Description=https://datasheet.ciiva.com/2465/dcrcwe3-2465536.pdf?src-supplier=Digikey, ComponentLink14URL=https://datasheet.ciiva.com/2465/dcrcwe3-2465536.pdf?src-supplier=Digikey, ComponentLink15Description=https://datasheet.ciiva.com/2465/dcrcwe3-2465534.pdf?src-supplier=Digikey, ComponentLink15URL=https://datasheet.ciiva.com/2465/dcrcwe3-2465534.pdf?src-supplier=Digikey, Construction=Rectangular, Contact Plating=Tin, Depth=0.85mm, Features="Automotive AEC-Q200", Height=0.45mm, Item Type=Resistor, Lead Free=5697LeadFree, Length=1.55mm, Manufacturer Part Number=CRCW06031K00FKEA, Military Standard=Not, Number of Terminations=2, Packaging="Tape and Reel", Pins=2, Power Rating=100mW, Pricing="1=0.1, 10=0.017, 50=0.017, 100=0.01, 1000=0.008, 10000=0.004 (USD)", Radiation Hardening=No, Reach SVHC Compliant=Unknown, RoHS=Yes, RoHS Compliant=Yes, Series=CRCW, Stock=1295653, Supplier=Mouser, Technology="THICK FILM", Termination=SMD/SMT, Tolerance=1%, Voltage Rating (DC)=75V, Weight=7.1E-05oz, Width=0.85mm
R105 R125: library part RC0402FR-07100RL, "RES 100 OHM 1% 1/16W 0402", Case Code (Imperial)=0402, Case Code (Metric)=1005, LCSC Part Number=C106232, Manufacturer=Yageo, Max Operating Temperature=155°C, Max Power Dissipation=63mW, Min Operating Temperature=-55°C, Power Rating=62.5mW, Resistance Tolerance=1%, Resistor Type="Thick Film", Supplier Part Number 1=603-RC0402FR-07100RL, Temperature Coefficient=100ppm/°C, Voltage Rating=50V, Case/Package=0402, Category="Chip SMD Resistors", ComponentLink1Description=https://datasheet.ciiva.com/11808/0900766b80c66297-11808765.pdf?src-supplier=RSComponents, ComponentLink1URL=https://datasheet.ciiva.com/11808/0900766b80c66297-11808765.pdf?src-supplier=RSComponents, ComponentLink2Description=https://datasheet.ciiva.com/7849/1784430-7849810.pdf?src-supplier=Element14, ComponentLink2URL=https://datasheet.ciiva.com/7849/1784430-7849810.pdf?src-supplier=Element14, ComponentLink3Description=https://datasheet.ciiva.com/28367/1018594-28367226.pdf?src-supplier=Element14, ComponentLink3URL=https://datasheet.ciiva.com/28367/1018594-28367226.pdf?src-supplier=Element14, ComponentLink4Description=https://datasheet.ciiva.com/22747/1018594-22747511.pdf?src-supplier=Element14, ComponentLink4URL=https://datasheet.ciiva.com/22747/1018594-22747511.pdf?src-supplier=Element14, ComponentLink5Description=https://datasheet.ciiva.com/12667/pyu-rc0402-51-rohs-l-6-r-12667957.pdf?src-supplier=Mouser, ComponentLink5URL=https://datasheet.ciiva.com/12667/pyu-rc0402-51-rohs-l-6-r-12667957.pdf?src-supplier=Mouser, ComponentLink6Description=https://datasheet.ciiva.com/15189/getdatasheetpartid-329466-15189335.pdf?src-supplier=Verical, ComponentLink6URL=https://datasheet.ciiva.com/15189/getdatasheetpartid-329466-15189335.pdf?src-supplier=Verical, ComponentLink7Description=https://datasheet.ciiva.com/16740/pyu-rc0402-51-rohs-l-6-r-16740566.pdf?src-supplier=Future+Electronics, ComponentLink7URL=https://datasheet.ciiva.com/16740/pyu-rc0402-51-rohs-l-6-r-16740566.pdf?src-supplier=Future+Electronics, Construction=Rectangular, Depth=0.5mm, Features="Moisture Resistant", Height=0.32mm, Item Type=Resistor, Lead Free="Lead Free", Length=1mm, Manufacturer Part Number=RC0402FR-07100RL, Military Standard=Not, Number of Pins=2, Number of Terminations=2, Packaging="Tape and Reel", Pricing 1="1=0.10000, 10=0.01200, 50=0.01200, 100=0.00500, 1000=0.00300, 2500=0.00200, 10000=0.00100 (USD)", REACH SVHC="No SVHC", Resistance=100R, RoHS=Yes, RoHS Compliant=Yes, Series=RC, Size Code=0402, Stock 1=699545, Supplier 1=Mouser, Technology="THICK FILM", Termination=SMD/SMT, Tolerance=1%, Voltage Rating (DC)=50V, Width=0.5mm
R107 R109 R113 R115: library part RC0603JR-074K7L, "RES SMD 4.7K OHM 5% 1/10W 0603", Case Code (Imperial)=0603, Case Code (Metric)=1608, LCSC Part Number=C105428, Manufacturer=Yageo, Max Operating Temperature=155°C, Min Operating Temperature=-55°C, Power Rating=100mW, Resistance=4.7kR, Supplier Part Number 1=311-4.7KGRCT-ND, Temperature Coefficient=100ppm/°C, Tolerance=5%, Voltage Rating=50V, Case/Package=0603, ComponentLink1Description=http://www.farnell.com/datasheets/443971.pdf?src-supplier=Element14, ComponentLink1URL=http://www.farnell.com/datasheets/443971.pdf?src-supplier=Element14, Composition="Thick Film", Depth=0.8mm, Item Type=Resistor, Lead Free="Lead Free", Length=1.6mm, Manufacturer Part Number=RC0603JR-074K7L, Military Standard=Not, Number of Pins=2, Packaging="Tape and Reel", Pricing 1="1=0.1, 10=0.02, 100=0.0081, 1000=0.00362, 2500=0.00314 (USD)", REACH SVHC="No SVHC", Stock 1=19706643, Supplier 1=Digi-Key, Termination=SMD/SMT, Voltage Rating (DC)=50V, Width=0.8mm
R117: library part ERJ-2GEJ472X, "RES SMD 4.7K OHM 5% 1/10W 0402", Case/Package=0402, Manufacturer=Panasonic, Max Operating Temperature=155°C, Min Operating Temperature=-55°C, Package Height=0.35mm, Package Length=1mm, Package Shape=Rectangular, Package Style=SMTMeter, Package Width=0.5mm, Power=100mW, Rated Temperature=70°C, Resistor Type="FIXED RESISTOR", Supplier Part Number 1=65T8287, Temperature Coefficient=200ppm/°C, Tolerance=5%, Working Voltage=50V, Category="Chip SMD Resistors", ComponentLink1Description=https://datasheet.ciiva.com:443/pdfs/VipMasterIC/IC/PANA/PANA-S-A0009891627/PANA-S-A0009891627-1.pdf?src-supplier=IHS+Markit, ComponentLink1URL=https://datasheet.ciiva.com:443/pdfs/VipMasterIC/IC/PANA/PANA-S-A0009891627/PANA-S-A0009891627-1.pdf?src-supplier=IHS+Markit, ComponentLink2Description=https://datasheet.ciiva.com/11821/0900766b80f806dd-11821328.pdf?src-supplier=Rs, ComponentLink2URL=https://datasheet.ciiva.com/11821/0900766b80f806dd-11821328.pdf?src-supplier=Rs, ComponentLink3Description=https://datasheet.ciiva.com/46377/1678796-46377565.pdf?src-supplier=Element14, ComponentLink3URL=https://datasheet.ciiva.com/46377/1678796-46377565.pdf?src-supplier=Element14, ComponentLink4Description=https://datasheet.ciiva.com/28514/1678796-28514168.pdf?src-supplier=Element14, ComponentLink4URL=https://datasheet.ciiva.com/28514/1678796-28514168.pdf?src-supplier=Element14, ComponentLink5Description=https://datasheet.ciiva.com/16758/70260739-16758341.pdf?src-supplier=Allied+Electronics, ComponentLink5URL=https://datasheet.ciiva.com/16758/70260739-16758341.pdf?src-supplier=Allied+Electronics, ComponentLink6Description=https://datasheet.ciiva.com/16770/70260739-16770309.pdf?src-supplier=Allied+Electronics, ComponentLink6URL=https://datasheet.ciiva.com/16770/70260739-16770309.pdf?src-supplier=Allied+Electronics, Construction=Rectangular, Item Type=Resistor, JESD-609 Code=e3, Manufacturer Part Number=ERJ-2GEJ472X, Mounting Technology="Surface Mount", Packaging="Tape and Reel", Pins=2, Pricing 1="1=0.12600, 10=0.04000, 30=0.01600, 50=0.01400, 100=0.01100, 250=0.00600 (USD)", Reach SVHC Compliant=Yes, Reference Standard=AEC-Q200, RoHS=Yes, RoHS Compliant=Yes, Stock 1=37243, Supplier 1=Avnet, Technology="METAL GLAZE/THICK FILM", Terminal Finish=Nickel, Termination=Wraparound
R118: library part RT0603BRD0710KL, "RES SMD 10K OHM 0.1% 1/10W 0603", Case/Package=0603, LCSC Part Number=C95204, Manufacturer=Yageo, Max Operating Temperature=155°C, Min Operating Temperature=-55°C, Package Height=0.45mm, Package Length=1.6mm, Package Style=SMTMeter, Package Width=0.8mm, Power=100mW, Rated Temperature=70°C, Resistor Type="FIXED RESISTOR", Supplier Part Number 1=1991391P, Temperature Coefficient=25ppm/°C, Tolerance=0.1%, Working Voltage=75V, Category="Chip SMD Resistors", ComponentLink1Description=https://datasheet.ciiva.com:443/pdfs/VipMasterIC/IC/YAGO/YAGO-S-A0008510989/YAGO-S-A0008510989-1.pdf?src-supplier=IHS+Markit, ComponentLink1URL=https://datasheet.ciiva.com:443/pdfs/VipMasterIC/IC/YAGO/YAGO-S-A0008510989/YAGO-S-A0008510989-1.pdf?src-supplier=IHS+Markit, ComponentLink2Description=https://datasheet.ciiva.com/5624/pyu-rt-1-to-0-05-rohs-l-4-5624351.pdf?src-supplier=Mouser, ComponentLink2URL=https://datasheet.ciiva.com/5624/pyu-rt-1-to-0-05-rohs-l-4-5624351.pdf?src-supplier=Mouser, ComponentLink3Description=https://datasheet.ciiva.com/29721/pyu-rt-1-to-0-05-rohs-l-4-29721177.pdf?src-supplier=Digi-Key, ComponentLink3URL=https://datasheet.ciiva.com/29721/pyu-rt-1-to-0-05-rohs-l-4-29721177.pdf?src-supplier=Digi-Key, Construction=Chip, Item Type=Resistor, Manufacturer Part Number=RT0603BRD0710KL, Mounting Technology="Surface Mount", Packaging="Tape and Reel", Pins=2, Pricing 1="100=0.29800, 250=0.27800, 500=0.25900, 1000=0.23700 (GBP)", Reach SVHC Compliant=Yes, RoHS=Yes, RoHS Compliant=Yes, Stock 1=20510, Supplier 1=Rs, Technology="THIN FILM", Termination=Wraparound
R121 R140: library part 0402WGF5603TCE, "62.5mW Thick Film Resistors 50V ±100ppm/℃ ±1% 560kΩ 0402 Chip Resistor - Surface Mount ROHS", LCSC Part Number=C132339, Manufacturer="UNI-ROYAL(Uniroyal Elec)", Package=0402, ComponentLink1Description=LCSC, ComponentLink1URL=https://www.lcsc.com/product-detail/Chip-Resistor-Surface-Mount_UNI-ROYAL-Uniroyal-Elec-0402WGF5603TCE_C132339.html, Item Type=Resistor, Manufacturer Part Number=0402WGF5603TCE
R122 R123 R124 R131 R132: library part RC0201JR-0710KL, "RES SMD 10K OHM 5% 1/20W 0201", Case Code (Imperial)=0201, Case Code (Metric)=0603, LCSC Part Number=C138117, Manufacturer=Yageo, Max Operating Temperature=125°C, Min Operating Temperature=-55°C, Power Rating=50mW, Resistance=10kR, Resistor Type="Thick Film", Supplier Part Number 1=311-10KNCT-ND, Temperature Coefficient=200ppm/°C, Tolerance=5%, Voltage Rating=25V, Case/Package=0201, Category="Chip SMD Resistors", ComponentLink1Description="New link", ComponentLink2Description=https://datasheet.ciiva.com/8891/pyu-rc0201-51-rohs-l-8-8891388.pdf?src-supplier=Avnet, ComponentLink2URL=https://datasheet.ciiva.com/8891/pyu-rc0201-51-rohs-l-8-8891388.pdf?src-supplier=Avnet, ComponentLink3Description=https://datasheet.ciiva.com/7672/1563626-7672253.pdf?src-supplier=Element14, ComponentLink3URL=https://datasheet.ciiva.com/7672/1563626-7672253.pdf?src-supplier=Element14, ComponentLink4Description=https://datasheet.ciiva.com/28405/pyu-rc0201-51-rohs-l-8-28405613.pdf?src-supplier=Avnet+Europe, ComponentLink4URL=https://datasheet.ciiva.com/28405/pyu-rc0201-51-rohs-l-8-28405613.pdf?src-supplier=Avnet+Europe, ComponentLink5Description=https://datasheet.ciiva.com/7672/1563626-7672254.pdf?src-supplier=Element14, ComponentLink5URL=https://datasheet.ciiva.com/7672/1563626-7672254.pdf?src-supplier=Element14, ComponentLink6Description=https://datasheet.ciiva.com/7660/1421516-7660810.pdf?src-supplier=Element14, ComponentLink6URL=https://datasheet.ciiva.com/7660/1421516-7660810.pdf?src-supplier=Element14, ComponentLink7Description=https://datasheet.ciiva.com/16856/pyu-rc0201-51-rohs-l-8-16856011.pdf?src-supplier=Avnet+Europe, ComponentLink7URL=https://datasheet.ciiva.com/16856/pyu-rc0201-51-rohs-l-8-16856011.pdf?src-supplier=Avnet+Europe, ComponentLink8Description=https://datasheet.ciiva.com/46391/1421516-46391291.pdf?src-supplier=Element14, ComponentLink8URL=https://datasheet.ciiva.com/46391/1421516-46391291.pdf?src-supplier=Element14, Contact Plating=Tin,Matte, Depth=0.3mm, Lead Free="Lead Free", Length=0.6mm, Manufacturer Part Number=RC0201JR-0710KL, Military Standard=Not, Packaging="Tape and Reel", Pricing 1="1=0.10000, 10=0.02600, 100=0.01050, 1000=0.00472, 2500=0.00410, 5000=0.00338 (USD)", Radiation Hardening=No, REACH SVHC=Unknown, RoHS=Yes, Stock 1=1488597, Supplier 1=Digi-Key, Termination=SMD/SMT, Voltage Rating (DC)=25V
R141: library part RC0402JR-07200KL, "Res Thick Film 0402 200K Ohm 5% 1/16W", Case Code (Imperial)=0402, Case Code (Metric)=1005, LCSC Part Number=C137903, Manufacturer=Yageo, Max Operating Temperature=155°C, Max Power Dissipation=63mW, Min Operating Temperature=-55°C, Package Quantity=1, Power Rating=62.5mW, Resistance=200kR, Resistance Tolerance=5%, Resistor Type="Thick Film", Supplier Part Number 1=311-200KJRCT-ND, Temperature Coefficient=100ppm/°C, Voltage Rating=50V, Case/Package=0402, Category="Chip SMD Resistors", ComponentLink1Description=https://datasheet.ciiva.com/2452/pyu-r-int-thick-7-2452740.pdf?src-supplier=Digi-Key, ComponentLink1URL=https://datasheet.ciiva.com/2452/pyu-r-int-thick-7-2452740.pdf?src-supplier=Digi-Key, ComponentLink2Description=https://datasheet.ciiva.com/2452/pyu-r-int-thick-7-2452741.pdf?src-supplier=Digi-Key, ComponentLink2URL=https://datasheet.ciiva.com/2452/pyu-r-int-thick-7-2452741.pdf?src-supplier=Digi-Key, ComponentLink3Description=https://datasheet.ciiva.com/8886/pyu-rc0402-51-rohs-l-6-8886901.pdf?src-supplier=Avnet, ComponentLink3URL=https://datasheet.ciiva.com/8886/pyu-rc0402-51-rohs-l-6-8886901.pdf?src-supplier=Avnet, ComponentLink4Description=https://datasheet.ciiva.com/28393/pyu-rc0402-51-rohs-l-6-28393445.pdf?src-supplier=Avnet+Europe, ComponentLink4URL=https://datasheet.ciiva.com/28393/pyu-rc0402-51-rohs-l-6-28393445.pdf?src-supplier=Avnet+Europe, ComponentLink5Description=https://datasheet.ciiva.com/2452/pyu-r-int-thick-7-2452742.pdf?src-supplier=Digi-Key, ComponentLink5URL=https://datasheet.ciiva.com/2452/pyu-r-int-thick-7-2452742.pdf?src-supplier=Digi-Key, ComponentLink6Description=https://datasheet.ciiva.com/12577/pyu-rc0402-51-rohs-l-6-r-12577561.pdf?src-supplier=Mouser, ComponentLink6URL=https://datasheet.ciiva.com/12577/pyu-rc0402-51-rohs-l-6-r-12577561.pdf?src-supplier=Mouser, ComponentLink7Description=https://datasheet.ciiva.com/7983/1018594-7983562.pdf?src-supplier=Element14, ComponentLink7URL=https://datasheet.ciiva.com/7983/1018594-7983562.pdf?src-supplier=Element14, ComponentLink8Description=https://datasheet.ciiva.com/17485/pyu-rc0402-51-rohs-l-6-r-17485631.pdf?src-supplier=Future+Electronics, ComponentLink8URL=https://datasheet.ciiva.com/17485/pyu-rc0402-51-rohs-l-6-r-17485631.pdf?src-supplier=Future+Electronics, Construction=Rectangular, Contact Plating=Tin,Matte, Depth=0.5mm, Features="Moisture Resistant", Height=0.016inch, Lead Free="Lead Free", Length=1mm, Manufacturer Part Number=RC0402JR-07200KL, Military Standard=Not, Number of Terminations=2, Packaging="Tape and Reel", Pricing 1="1=0.10000, 10=0.01300, 100=0.00540, 1000=0.00244, 2500=0.00212, 5000=0.00175 (USD)", Radiation Hardening=No, REACH SVHC="No SVHC", RoHS=Yes, RoHS Compliant=Yes, Series=RC, Size Code=0402, Stock 1=182081, Supplier 1=Digi-Key, Termination=SMD/SMT, Tolerance=5%, Voltage Rating (DC)=50V, Weight=2.3E-05oz, Width=0.02inch
R144 R145: library part RC0603FR-072K49L, "RES 2.49K OHM 1% 1/10W 0603", Case Code (Imperial)=0603, Case Code (Metric)=1608, LCSC Part Number=C108190, Manufacturer=Yageo, Max Operating Temperature=155°C, Max Power Dissipation=100mW, Min Operating Temperature=-55°C, Resistance Tolerance=1%, Resistor Type="Thick Film", Supplier Part Number=4546610, Temperature Coefficient=100ppm/°C, Voltage Rating=50V, Case/Package=0603, Category="Chip SMD Resistors", ComponentLink1Description=https://datasheet.ciiva.com/46395/443971-46395001.pdf?src-supplier=Element14, ComponentLink1URL=https://datasheet.ciiva.com/46395/443971-46395001.pdf?src-supplier=Element14, Features="Moisture Resistant", Height=450um, Item Type=Resistor, Lead Free=5697LeadFree, Length=1.6mm, Manufacturer Part Number=RC0603FR-072K49L, Number of Terminations=2, Packaging="Tape and Reel", Pins=2NUMBER, Power Rating=100mW, Pricing="5000=0.0013, 50000=0.0013, 150000=0.0012, 375000=0.0012, 1000000=0.0011 (USD)", Reach SVHC Compliant=Unknown, RoHS=Yes, RoHS Compliant=Yes, Series=RC, Stock=2930000, Supplier="Future Electronics", Termination=SMD/SMT, Tolerance=1%, Voltage Rating (DC)=50V, Width=800um
R146: library part AF0402JR-071ML, "RES SMD 1M OHM 5% 1/16W 0402", Case/Package=0402, LCSC Part Number=C144054, Manufacturer=Yageo, Max Operating Temperature=155°C, Max Power Dissipation=63mW, Min Operating Temperature=-55°C, Resistance=1MR, Resistor Type="Thick Film", Supplier Part Number 1=AF0402JR-071ML-ND, Temperature Coefficient=100ppm/°C, Tolerance=5%, ComponentLink1Description=https://www.yageo.com/upload/media/product/productsearch/datasheet/rchip/PYu-AF_51_RoHS_L_6.pdf?src-supplier=Digi-Key, ComponentLink1URL=https://www.yageo.com/upload/media/product/productsearch/datasheet/rchip/PYu-AF_51_RoHS_L_6.pdf?src-supplier=Digi-Key, Features="Moisture Resistant,Anti-Sulfur", Height=0.015inch, Item Type=Resistor, Length=0.039inch, Manufacturer Part Number=AF0402JR-071ML, Number of Terminations=2, Packaging="Tape and Reel", Pricing 1="10000=0.00408 (USD)", RoHS Compliant=Yes, Stock 1=0, Supplier 1=Digi-Key, Width=0.02inch
SB1 SB2 SB3 SB4 SB5 SB6 SB7 SB8 SB9 SB11 SB13 SB15 SB17: "Solder Bridge ON", Manufacturer Part Number="Solder Bridge", Item Type="Solder Bridge"
SW1 SW2: "SPDT 50mA @ 12VDC 12V On-On SMD Toggle Switches RoHS", Contact Rating @ Voltage="50mA @ 12VDC", LCSC Part Number=C381097, Manufacturer="XKB Connectivity", Operating Force=200±100gf, Package=SMD, Rated Voltage(DC)=12V, Actuator Orientation=Vertical, Actuator Type=Standard, Circuit=SPDT, ComponentLink1Description=LCSC, ComponentLink1URL=https://www.lcsc.com/product-detail/Slide-Switches_XKB-Connectivity-SS-3235D-03-L2_C381097.html, Contact Finish=Silver, Contact Material=Brass, Electrical Life Cycles=10000, Manufacturer Part Number=SS-3235D-03-L2, Mounting Type="Surface Mount", Switch Height=3mm